# Altium PCB 0060631C.PcbDoc (part 4 of 7)
Units mil, origin at the board's own origin, x right, y up, seen from the top; angles counter-clockwise.
Board outline 5480 x 8249 mil, 6 copper layers (Top Layer, Mid-Layer 1, Mid-Layer 2, Internal Plane 1, Internal Plane 2, Bottom Layer); 514 components, 269 nets, 1375 pads, 1334 vias.
Unrouted connection lines stored in the file: 126.
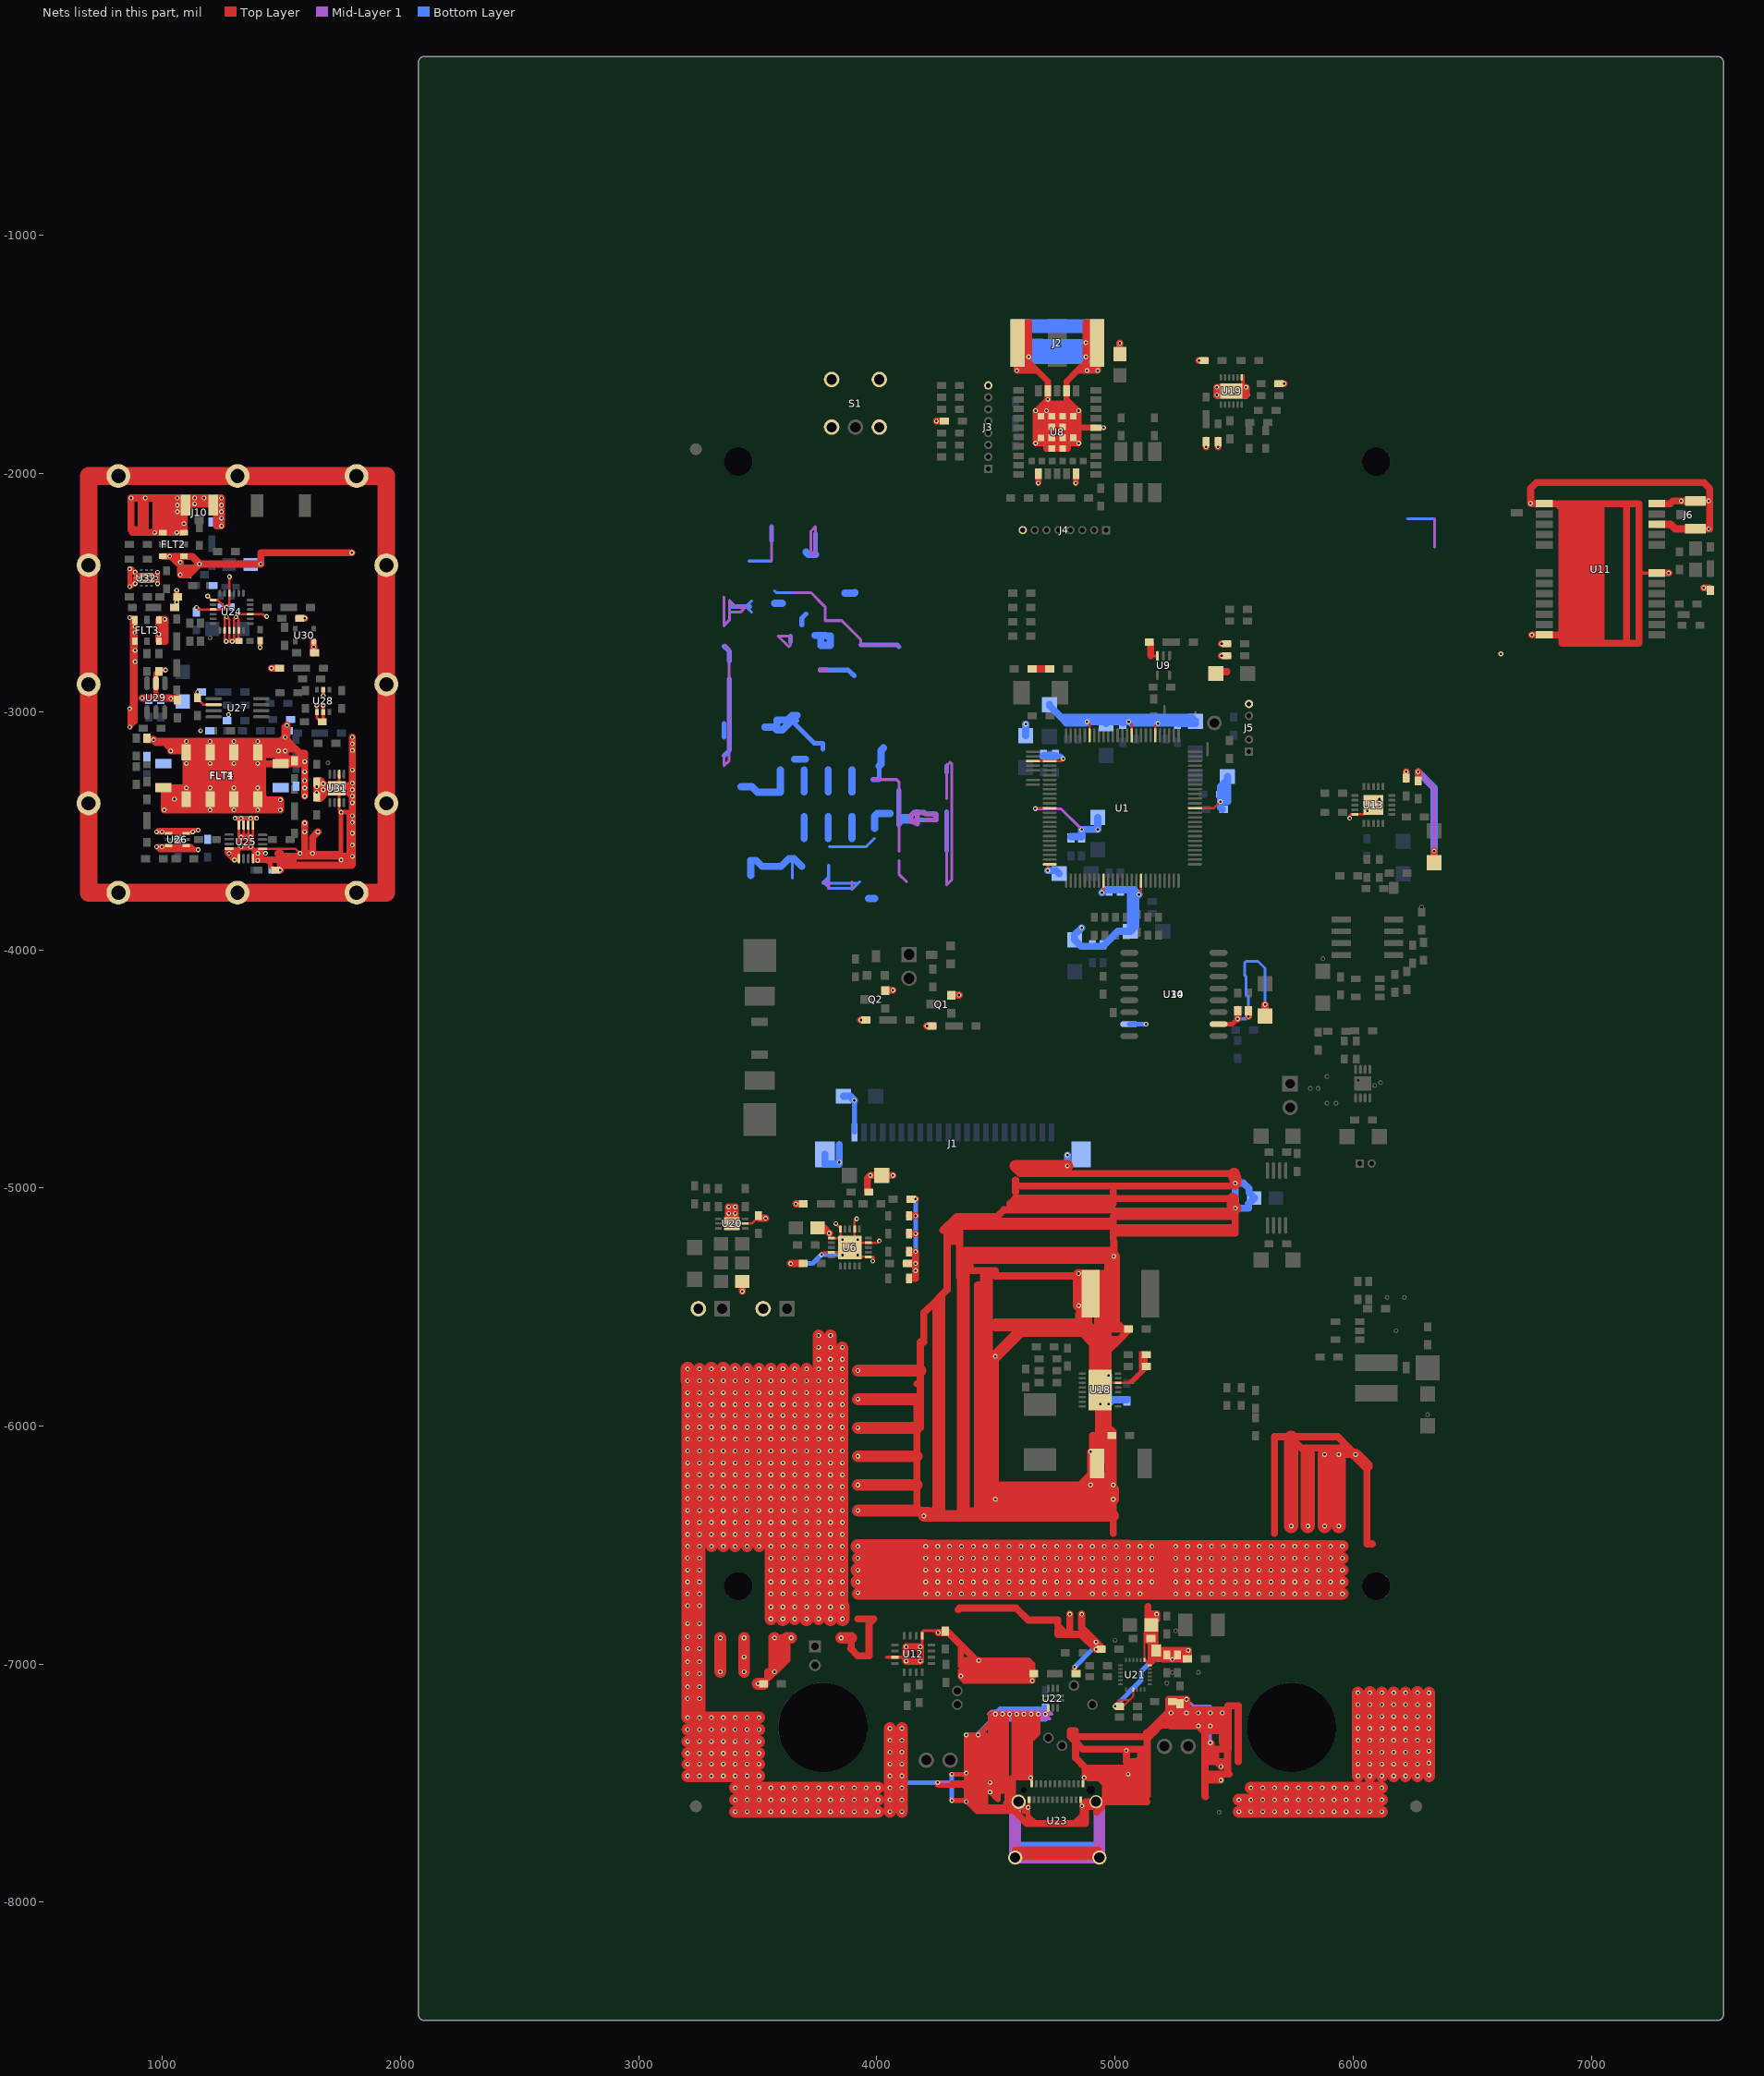
[diagram p8: the nets of this part, all layers, seen from the top]

## Via types
v1: diameter 20, hole 10, Top Layer to Bottom Layer, 1334 vias

## Nets (pads, with @x,y where several pads share a name; then routed paths per layer and width w, separated by ;. In a path a pad name is that pad's centre, name@x,y a point inside that pad or via, vN(x,y) a via of type N, cw(c..) or ccw(c..) an arc to the next point about the centre after c; other vN are vias at no path point) (continued)
GND: (continued)
  Top Layer w30: v1(915,-2942.5) v1(970,-2942.5) 1032.5,-2942.5 v1(1035,-2945) C81.1@1062.5,-2945 ; C79.2@935,-3117.5 v1(962.5,-3117.5) 970,-3125 ; FLT2.6@1001.5,-2347.5 v1(1030,-2347.5) v1@1037.5,-2347.5 ; FLT1.12@1004,-3319 FLT1.12@1005,-3320 ; v1(1050,-3367.5) FLT1.1@1100,-3367.5 ; v1(1330,-3567.5) v1(1370,-3567.5) ~FV41.FV@1370,-3527.5 1360.1,-3527.5 1340.4,-3527.5 v1(1330,-3527.5) ; v1(1457.5,-2817.5) R104.1@1485,-2817.5 ; C120.2@1470,-3665 C120.2@1476,-3665 v1(1495,-3665) 1495,-3645 ; 1484.9,-3595 1495,-3595 ; FLT1.6@1496,-3219 FLT1.6@1496.3,-3218.7 ; 1507.5,-3197.5 1515,-3197.5 ; C78.2@1555,-3212.5 C78.2@1548.8,-3218.7 ; C88.2@1570,-2607.5 C88.2@1576,-2607.5 v1(1597.5,-2607.5) ; 1597.5,-3595 v1(1597.5,-3505) v1(1597.5,-3467.5) ; v1(1597.5,-3355) v1(1597.5,-3320) v1(1597.5,-3290) v1(1597.5,-3252.5) 1597.5,-3225 ; 1615,-3595 1615,-3600 1622.5,-3607.5 ; v1(1630,-3595) 1630,-3527.5 ~FV101.FV@1652.5,-3505 ; R107.2@1632.5,-2752.5 1635,-2750 v1(1635,-2727.5) 1634.5,-2727 U30.2@1634.5,-2705.6 ; U31.9@1732.3,-3322.6 U31.9@1719.7,-3310 ; U31.9@1742.1,-3335 U31.9@1740.1,-3335 ; U31.9@1742.1,-3324.6 U31.9@1740.1,-3322.6 ; U31.9@1742.1,-3320.4 1740.1,-3322.4 U31.9@1740.1,-3322.6 ; U31.9@1742.5,-3335 v1(1752.5,-3335) 1777.5,-3335 v1(1797.5,-3355) ; v1(1795,-2332.5) 1412.5,-2332.5 v1(1412.5,-2380) v1@1157.5,-2380 ; v1(1797.5,-3437.5) v1(1797.5,-3465) v1(1797.5,-3510) v1(1797.5,-3560) 1797.5,-3590 v1(1797.5,-3607.5) ; 1797.5,-3422.5 v1(1797.5,-3382.5) v1(1797.5,-3355) ; v1(1797.5,-3107.5) v1(1797.5,-3135) v1(1797.5,-3162.5) v1(1797.5,-3245) v1(1797.5,-3300) ; v1(3435,-5435) C65.2@3435,-5392.5 ; C64.2@3502.5,-5122.5 3507.5,-5127.5 v1(3532.5,-5127.5) ; R126.2@3524,-7082.5 R126.2@3530,-7082.5 ; v1(3637.5,-5317.5) R24.1@3685,-5317.5 ; v1(3660,-5067.5) R127.1@3685,-5067.5 ; D1.2@3750,-5167.5 3777.5,-5167.5 v1(3800,-5190) ; U6.21@3886.4,-5250.4 3887.1,-5250.4 U6.21@3906.4,-5231.1 ; 3892.5,-6890 3892.5,-6932.5 3890,-6935 3920,-6965 3967.5,-6965 3967.5,-6830 3987.5,-6810 3920,-6810 ; U6.21@3906.1,-5230.7 U6.21@3906.4,-5231.1 ; v1(3920,-5282.5) v1(3855,-5282.5) 3855,-5270.1 3855,-5219 ~FV46.FV@3855,-5217.5 3906.1,-5217.5 ~FV45.FV@3920,-5217.5 3906.8,-5230.7 U6.21@3906.4,-5231.1 ; v1(3932.5,-4295) R4.2@3954,-4295 R4.2@3960,-4295 ; C30.2@3960,-5017.5 3960,-4960 v1(3972.5,-4947.5) C32.2@4020,-4947.5 v1(4067.5,-4947.5) ; Q2.2@4047.5,-4170 v1(4067.5,-4170) ; ~FV120.FV@4122.5,-6987.5 ~FV120.FV@4122.5,-6985 ; C28.2@4122.5,-5317.5 C28.2@4128.5,-5317.5 v1(4162.5,-5317.5) ; U4.2@4135,-5380 4162.5,-5380 v1(4162.5,-5347.5) v1(4162.5,-5317.5) ; U2.2@4135,-5267.5 v1(4162.5,-5267.5) v1(4162.5,-5317.5) ; U5.2@4135,-5192.5 v1(4162.5,-5192.5) ; U3.2@4135,-5117.5 v1(4162.5,-5117.5) ; C29.2@4137.5,-5047.5 C29.2@4143.5,-5047.5 v1(4162.5,-5047.5) ; 4167.5,-5822.5 4182.5,-5822.5 ; v1(4210,-4320) R7.2@4231.5,-4320 R7.2@4237.5,-4320 ; v1(4250,-1780) R27.2@4277.5,-1780 ; v1(4257.5,-6867.5) 4300,-6867.5 4352.5,-6920 ~FV93.FV@4417.5,-6985 ; 4272.5,-6357.5 4272.5,-5460 4267.5,-5455 ; 4277.5,-5177.5 4295,-5160 ; Q1.2@4325,-4190 v1(4345,-4190) ; 4341.2,-6771.2 4347.4,-6765 4585,-6765 4635,-6815 4760,-6815 4760,-6840.2 4795,-6875.2 ; 4372.5,-6985 ~FV93.FV@4417.5,-6985 ; 4390,-7582.5 4407.5,-7600 ; ~FV93.FV@4427.5,-6985 ~FV93.FV@4417.5,-6985 ; ~FV104.FV@4497.4,-5707.5 4497.4,-6247.5 ; 4545,-7585 4562,-7602 ; 4562.5,-7602 4562,-7602 ; 4582.5,-5017.5 4582.5,-4992.5 ; 4582.5,-4967.5 4582.5,-4992.5 ; 4582.5,-4907.5 4582.5,-4922.43 4600.07,-4940 5500,-4940 ; J2.2@4590,-1522.5 J2.2@4602.5,-1510 ; J2.2@4590,-1464.6 J2.2@4590,-1452.5 4590,-1367.5 J2.2@4605,-1367.5 ; 4594.9,-5610 4859.9,-5610 ; J2.2@4602.5,-1507.5 J2.2@4605,-1507.5 ; J2.2@4605,-1467.5 J2.2@4605,-1367.5 ; C11.2@4657.5,-2820 C12.2@4720,-2820 ; 4760,-6857.5 4760,-6875 4760.2,-6875.2 4795,-6875.2 ; v1(4810,-6790.2) 4810,-6875.2 ; v1(4847.4,-5495) C62.2@4867.4,-5495 ; v1(4860,-6790.2) 4860,-6847.7 ~FV49.FV@4920,-6907.7 ; C62.2@4904.9,-5530 C62.2@4889.9,-5530 ; C62.2@4904.9,-5522.5 4897.4,-5515 4904.9,-5515 4904.9,-5445 C62.2@4897.4,-5445 ; 4922.8,-7623 4943.3,-7602.5 4943.3,-7597 4876.3,-7597 ; J2.3@4925,-1452.5 4925,-1367.5 4892.5,-1367.5 ; U23.S3@4934.3,-7812.5 U23.S3@4929.3,-7807.5 ; U18.17@4937.4,-5847.5 U18.17@4937.4,-5848.6 ; U18.17@4947.4,-5838.6 4947.4,-5848.6 U18.17@4937.4,-5848.6 ; 4960,-7495 4960,-7485 5135,-7485 ; 4969.9,-5617.5 4969.9,-5637.5 ; 4992.3,-6377.5 4992.4,-6377.4 ; 4992.4,-6450 4992.4,-6377.4 ; 4992.4,-6287.5 4497.4,-6287.5 ~FV102.FV@4497.4,-6307.5 ; 4992.5,-6377.5 4992.4,-6377.4 ; C25.2@5020,-1497.5 v1(5020,-1452.5) ; 5047.5,-7477 4960,-7477 ; 5047.5,-7447 4960,-7447 ; v1(5047.5,-7362.5) 5047.5,-7410 5092.6,-7410 ; 5133.7,-7578.2 U23.S2@4943.8,-7578.2 ; C66.2@5137.5,-6900.2 C66.2@5140,-6900.2 ; 5137.5,-6757.5 C67.2@5137.5,-6850.2 ; 5150,-2765 R20.2@5150,-2707.5 ; 5162.5,-6980.2 5152.5,-6980.2 5152.5,-6900.2 C66.2@5140,-6900.2 ; C71.2@5272.5,-7160.2 C71.2@5260,-7147.7 ; C73.2@5307.5,-6967.7 5307.5,-6965.2 C73.2@5295,-6965.2 ; v1(5352.5,-1525) C63.2@5374,-1525 C63.2@5380,-1525 ; 5380,-7557.5 5377.5,-7555 5377.5,-7487.5 ; v1(5382.5,-1887.5) R78.2@5382.5,-1866 R78.2@5382.5,-1860 ; v1(5400,-7330.2) 5402.4,-7332.6 5402.4,-7385.1 ; C37.2@5422.5,-2840 5430,-2832.5 5470,-2832.5 ; v1(5432.5,-1887.5) R79.2@5432.5,-1866 R79.2@5432.5,-1860 ; v1(5445,-7487.5) 5377.5,-7487.5 ; v1(5445,-7430) v1@5445,-7427.7 ; v1(5447.5,-2765) C36.2@5469,-2765 C36.2@5475,-2765 ; v1(5447.5,-2715) C38.2@5469,-2715 C38.2@5475,-2715 ; 5493.67,-5045 4992.5,-5045 4992.5,-5066.5 4991.5,-5067.5 4557.5,-5067.5 4582.5,-5042.5 4992.5,-5042.5 4992.5,-4992.5 ; v1(5505,-5085) 5505,-5097.5 ; v1(5505,-4980) 5505,-4992.5 4992.5,-4992.5 ; v1(5515,-4290) C33.2@5515,-4256 C33.2@5515,-4250 ; 5517.5,-7410 5517.5,-7175.2 5475,-7175.2 5475,-7192.5 ; v1(5560,-4280) C34.2@5560,-4256 C34.2@5560,-4250 ; C35.2@5630,-4277.5 v1(5630,-4230) ; 5670,-6450 5670,-6045 5740,-6045 ; R76.2@5682.5,-1622.5 R76.2@5688.5,-1622.5 v1(5710,-1622.5) ; 5810,-6120 5787.5,-6097.5 ; ~FV119.FV@5880,-6120 ~FV118.FV@5940,-6120 ~FV117.FV@6010,-6120 5982.5,-6092.5 ; 6057.5,-6167.5 6057.5,-6495 6080,-6495 ; v1(6060,-3417.5) 6084.4,-3393.1 6084.4,-3392.4 U13.21@6084.4,-3391.9 ; U13.21@6084.6,-3391.6 U13.21@6084.9,-3391.9 ; C41.2@6222.5,-3285 C41.2@6222.5,-3279 v1(6222.5,-3252.5) ; C47.2@6272.5,-3285 v1(6272.5,-3252.5) ; C57.2@6340,-3635 v1(6340,-3585) ; v1(6750,-2677.5) U11.24@6802.8,-2677.5 6877.5,-2677.5 ; 7200.2,-2417.7 7200,-2417.5 ; U11.7@7275,-2417.7 7324.8,-2417.7 v1(7325,-2417.5) ; U11.10@7275,-2213.1 7333.1,-2213.1 7352.5,-2232.5 J6.3@7439,-2232.5 ; U11.12@7275,-2126.5 7331,-2126.5 7342.5,-2115 v1(7377.5,-2115) J6.2@7437.5,-2115 v1(7492.5,-2115) v1@7497.5,-2115 ; J6.3@7437.5,-2231 J6.3@7439,-2232.5 ; v1(7472.5,-2480) 7495,-2480 C39.2@7500,-2485 ; 887.5,-2235 875,-2247.5 v1(967.5,-2247.5) 977.5,-2247.5 ; 887.5,-2235 907.5,-2235 ; 887.5,-2235 867.5,-2235 v1(867.5,-2102.5) 910,-2102.5 ; 907.5,-2235 927.5,-2235 ~FV82.FV@927.5,-2102.5 ; 907.5,-2235 910,-2232.5 910,-2102.5 ; 910,-2102.5 ~FV82.FV@927.5,-2102.5 ; ~FV82.FV@927.5,-2102.5 972.5,-2102.5 ; 970,-3125 v1(1100,-3125) ; 970,-3125 975,-3130 1010,-3130 1035,-3155 ; v1@972.5,-2242.5 995,-2220 995,-2102.5 ; v1@972.5,-2242.5 977.5,-2247.5 ; v1@972.5,-2242.5 972.5,-2102.5 ; 972.5,-2102.5 995,-2102.5 ; 977.5,-2247.5 FLT2.4@1001.5,-2247.5 1020,-2247.5 ; 995,-2102.5 1020,-2102.5 ; FLT1.12@1005,-3320 ~FV38.FV@1100,-3320 ; FLT1.12@1005,-3320 1007.5,-3322.5 v1(1007.5,-3412.5) ; v1(1007.5,-3412.5) 1100,-3412.5 ; v1(1007.5,-3412.5) ~FV37.FV@1010,-3410 ; ~FV37.FV@1010,-3410 1010,-3347.5 1030,-3347.5 ; ~FV37.FV@1010,-3410 1032.5,-3387.5 ; 1020,-2247.5 1020,-2237.5 ; 1020,-2247.5 1030,-2247.5 ; 1020,-2237.5 1030,-2247.5 ; 1020,-2237.5 1020,-2102.5 ; 1020,-2102.5 1042.5,-2102.5 ; 1030,-3347.5 FLT1.1@1100,-3347.5 ; 1030,-3347.5 1030,-3385 1032.5,-3387.5 ; 1030,-2247.5 v1(1060,-2247.5) FLT2.3@1090,-2247.5 1090,-2227.5 ; 1032.5,-3387.5 FLT1.1@1100,-3387.5 ; 1035,-3155 FLT1.10@1100,-3155 ; 1035,-3155 ~FV36.FV@1035,-3165 1094.5,-3165 FLT1.10@1100,-3170.5 ; v1@1037.5,-2347.5 FLT2.1@1090,-2347.5 1125,-2347.5 v1@1157.5,-2380 ; v1@1037.5,-2347.5 1062.5,-2372.5 ; 1042.5,-2210 1042.5,-2102.5 ; 1042.5,-2210 1042.5,-2227.5 1090,-2227.5 ; 1042.5,-2210 1062.5,-2210 ; 1042.5,-2102.5 v1(1062.5,-2102.5) ; 1062.5,-2372.5 1075,-2385 ; 1062.5,-2372.5 v1(1075,-2372.5) 1075,-2385 ; 1062.5,-2210 ~FV31.FV@1090,-2210 ; 1062.5,-2210 v1(1062.5,-2160) v1(1062.5,-2132.5) v1(1062.5,-2102.5) ; v1(1062.5,-2102.5) ~FV30.FV@1127.5,-2102.5 ; 1075,-2397.5 1137.5,-2397.5 ; 1075,-2397.5 v1(1075,-2425) 1110,-2425 1137.5,-2397.5 ; 1075,-2397.5 1075,-2385 ; 1090,-2227.5 ~FV31.FV@1090,-2210 ; ~FV31.FV@1090,-2210 J10.2@1090,-2160 ; J10.2@1090,-2160 1122.5,-2127.5 ~FV72.FV@1135,-2127.5 ; J10.2@1090,-2160 1090,-2140 J10.2@1097.5,-2132.5 ~FV30.FV@1127.5,-2102.5 ; 1100,-3412.5 v1(1200,-3412.5) ; 1100,-3412.5 FLT1.1@1100,-3387.5 ; FLT1.1@1100,-3387.5 FLT1.2@1200,-3387.5 ; FLT1.1@1100,-3387.5 FLT1.1@1100,-3367.5 ; FLT1.1@1100,-3367.5 FLT1.1@1100,-3347.5 ; FLT1.1@1100,-3367.5 1107.5,-3360 FLT1.2@1200,-3360 ; FLT1.1@1100,-3347.5 1100,-3332.5 ; 1100,-3332.5 1200,-3332.5 ; 1100,-3332.5 ~FV38.FV@1100,-3320 ; ~FV38.FV@1100,-3320 1100,-3305 ; 1100,-3305 1200,-3305 ; 1100,-3305 1100,-3277.5 ; 1100,-3277.5 1100,-3247.5 ; 1100,-3277.5 1200,-3277.5 ; 1100,-3247.5 v1(1100,-3217.5) v1@1100,-3215 ; 1100,-3247.5 1200,-3247.5 ; v1@1100,-3215 1103.7,-3218.7 v1@1200,-3218.7 ; v1@1100,-3215 FLT1.10@1100,-3170.5 ; v1@1100,-3215 1117.5,-3197.5 FLT1.9@1200,-3197.5 ; FLT1.10@1100,-3170.5 FLT1.10@1100,-3155 ; FLT1.10@1100,-3170.5 1109.5,-3180 FLT1.9@1200,-3180 ; FLT1.10@1100,-3155 FLT1.9@1200,-3155 ; FLT1.10@1100,-3155 FLT1.10@1100,-3147.5 ; FLT1.10@1100,-3147.5 FLT1.9@1200,-3147.5 ; FLT1.10@1100,-3147.5 v1(1100,-3125) ; v1(1100,-3125) v1(1200,-3125) ; ~FV30.FV@1127.5,-2102.5 ~FV30.FV@1135,-2102.5 ; ~FV72.FV@1135,-2127.5 1175,-2127.5 ; ~FV72.FV@1135,-2127.5 ~FV30.FV@1135,-2102.5 ; ~FV30.FV@1135,-2102.5 ~FV71.FV@1175,-2102.5 ; 1137.5,-2397.5 v1(1155,-2380) v1@1157.5,-2380 ; 1175,-2127.5 J10.3@1218.5,-2127.5 ; 1175,-2127.5 ~FV71.FV@1175,-2102.5 ; ~FV71.FV@1175,-2102.5 v1@1243.5,-2102.5 ; v1(1200,-3412.5) v1(1300,-3412.5) ; v1(1200,-3412.5) FLT1.2@1200,-3387.5 ; FLT1.2@1200,-3387.5 FLT1.3@1300,-3387.5 ; FLT1.2@1200,-3387.5 FLT1.2@1200,-3367.5 FLT1.2@1200,-3360 ; FLT1.2@1200,-3360 FLT1.3@1300,-3360 ; FLT1.2@1200,-3360 1200,-3332.5 ; 1200,-3332.5 1300,-3332.5 ; 1200,-3332.5 v1(1200,-3320) 1200,-3305 ; 1200,-3305 1300,-3305 ; 1200,-3305 1200,-3277.5 ; 1200,-3277.5 1300,-3277.5 ; 1200,-3277.5 1200,-3247.5 ; 1200,-3247.5 v1@1200,-3218.7 ; 1200,-3247.5 1300,-3247.5 ; v1@1200,-3218.7 v1@1300,-3218.7 ; v1@1200,-3218.7 v1(1200,-3217.5) FLT1.9@1200,-3197.5 ; FLT1.9@1200,-3197.5 FLT1.8@1300,-3197.5 ; FLT1.9@1200,-3197.5 FLT1.9@1200,-3180 ; FLT1.9@1200,-3180 FLT1.8@1300,-3180 ; FLT1.9@1200,-3180 FLT1.9@1200,-3170.5 FLT1.9@1200,-3155 ; FLT1.9@1200,-3155 FLT1.8@1300,-3155 ; FLT1.9@1200,-3155 FLT1.9@1200,-3147.5 ; FLT1.9@1200,-3147.5 FLT1.8@1300,-3147.5 ; FLT1.9@1200,-3147.5 v1(1200,-3125) ; v1(1200,-3125) v1(1300,-3125) ; J10.3@1218.5,-2127.5 v1@1243.5,-2102.5 ; J10.3@1218.5,-2127.5 J10.3@1213.5,-2132.5 1227.5,-2146.5 1227.5,-2220 v1(1247.5,-2220) v1(1247.5,-2187.5) v1(1247.5,-2160) v1(1247.5,-2132.5) v1(1247.5,-2102.5) v1@1243.5,-2102.5 ; v1(1300,-3412.5) v1(1400,-3412.5) ; v1(1300,-3412.5) FLT1.3@1300,-3387.5 ; FLT1.3@1300,-3387.5 1397.5,-3387.5 FLT1.4@1400,-3390 ; FLT1.3@1300,-3387.5 FLT1.3@1300,-3367.5 FLT1.3@1300,-3360 ; FLT1.3@1300,-3360 FLT1.4@1400,-3360 ; FLT1.3@1300,-3360 1300,-3332.5 ; 1300,-3332.5 1387.5,-3332.5 ; 1300,-3332.5 v1(1300,-3320) 1300,-3305 ; 1300,-3305 1395,-3305 ; 1300,-3305 1300,-3277.5 ; 1300,-3277.5 1300,-3247.5 ; 1300,-3277.5 1400,-3277.5 ; 1300,-3247.5 v1@1300,-3218.7 ; 1300,-3247.5 1400,-3247.5 v1@1400,-3218.7 ; v1@1300,-3218.7 v1@1400,-3218.7 ; v1@1300,-3218.7 v1(1300,-3217.5) FLT1.8@1300,-3197.5 ; FLT1.8@1300,-3197.5 FLT1.7@1400,-3197.5 ; FLT1.8@1300,-3197.5 FLT1.8@1300,-3180 ; FLT1.8@1300,-3180 FLT1.7@1400,-3180 ; FLT1.8@1300,-3180 FLT1.8@1300,-3170.5 FLT1.8@1300,-3155 ; FLT1.8@1300,-3155 FLT1.7@1400,-3155 ; FLT1.8@1300,-3155 FLT1.8@1300,-3147.5 ; FLT1.8@1300,-3147.5 FLT1.7@1400,-3147.5 ; FLT1.8@1300,-3147.5 v1(1300,-3125) ; v1(1300,-3125) v1(1400,-3125) ; 1387.5,-3332.5 1400,-3332.5 ; 1387.5,-3332.5 v1(1400,-3320) ; 1395,-3305 1400,-3305 ; 1395,-3305 1400,-3300 ; v1(1400,-3412.5) v1(1495,-3412.5) 1495,-3390 ; v1(1400,-3412.5) FLT1.4@1400,-3390 ; FLT1.4@1400,-3390 FLT1.4@1400,-3387.5 ; FLT1.4@1400,-3387.5 1402.5,-3390 1495,-3390 ; FLT1.4@1400,-3387.5 FLT1.4@1400,-3367.5 ; FLT1.4@1400,-3367.5 1402.5,-3370 1435,-3370 ; FLT1.4@1400,-3367.5 FLT1.4@1400,-3360 ; FLT1.4@1400,-3360 1400,-3332.5 ; 1400,-3332.5 v1(1400,-3320) ; v1(1400,-3320) 1400,-3305 ; 1400,-3305 1400,-3300 ; 1400,-3300 1400,-3277.5 ; 1400,-3277.5 1420,-3277.5 ; v1@1400,-3218.7 1420,-3218.7 ; v1@1400,-3218.7 v1(1400,-3217.5) FLT1.7@1400,-3197.5 ; FLT1.7@1400,-3197.5 1420,-3197.5 ; FLT1.7@1400,-3197.5 FLT1.7@1400,-3180 ; FLT1.7@1400,-3180 1420,-3180 ; FLT1.7@1400,-3180 FLT1.7@1400,-3170.5 FLT1.7@1400,-3155 ; FLT1.7@1400,-3155 1420,-3155 ; FLT1.7@1400,-3155 FLT1.7@1400,-3147.5 ; FLT1.7@1400,-3147.5 v1(1400,-3125) ; v1(1400,-3125) 1420,-3125 ; 1420,-3277.5 1420,-3355 1435,-3370 ; 1420,-3277.5 1420,-3218.7 ; 1420,-3218.7 1420,-3197.5 ; 1420,-3218.7 FLT1.6@1496.3,-3218.7 ; 1420,-3197.5 1420,-3180 ; 1420,-3180 1420,-3155 ; 1420,-3180 1487.5,-3180 ; 1420,-3155 1487.5,-3155 ; 1420,-3155 1420,-3125 ; 1420,-3125 1485,-3125 ; 1435,-3370 v1(1495,-3370) 1495,-3390 ; 1485,-3125 1487.5,-3127.5 1487.5,-3147.5 ; 1485,-3125 1497.5,-3125 v1(1515,-3107.5) ; 1487.5,-3180 1495,-3180 ; 1487.5,-3180 1487.5,-3209.9 FLT1.6@1496.3,-3218.7 ; 1487.5,-3155 1505,-3155 v1(1515,-3165) ; 1487.5,-3155 v1(1487.5,-3165) v1@1495,-3165 ; 1487.5,-3155 1487.5,-3147.5 ; 1487.5,-3147.5 1515,-3147.5 ; 1495,-3645 1795,-3645 1797.5,-3642.5 1797.5,-3620 v1(1797.5,-3607.5) ; 1495,-3645 1495,-3622.5 1495,-3612.5 ; 1495,-3612.5 1507.5,-3607.5 ; 1495,-3612.5 1495,-3595 ; 1495,-3595 1507.5,-3607.5 ; 1495,-3180 v1@1495,-3165 ; 1495,-3180 1505,-3180 1515,-3190 ; v1@1495,-3165 v1(1515,-3165) ; FLT1.6@1496.3,-3218.7 1515,-3200 1515,-3197.5 ; FLT1.6@1496.3,-3218.7 C78.2@1548.8,-3218.7 ; 1507.5,-3607.5 1552.5,-3607.5 1622.5,-3607.5 ; 1515,-3197.5 1597.5,-3197.5 ; 1515,-3197.5 1515,-3190 ; 1515,-3190 v1(1515,-3165) ; v1(1515,-3165) v1@1515,-3160 ; v1@1515,-3160 1515,-3147.5 ; v1@1515,-3160 1518.7,-3156.3 1558.8,-3156.3 ; 1515,-3147.5 v1@1515,-3112.5 ; v1@1515,-3112.5 v1(1515,-3107.5) ; v1@1515,-3112.5 1558.8,-3156.3 ; v1(1515,-3107.5) 1515,-3065 v1(1522.5,-3057.5) 1522.5,-3100 v1(1515,-3107.5) ; C78.2@1548.8,-3218.7 1591.2,-3218.7 1597.5,-3225 ; 1558.8,-3156.3 1577.5,-3175 1597.5,-3175 1597.5,-3197.5 ; 1597.5,-3225 v1(1597.5,-3210) 1597.5,-3197.5 ; 1622.5,-3607.5 1750,-3607.5 v1(1797.5,-3607.5) ; v1(1647.5,-3340) 1660,-3352.5 1662.5,-3352.5 1662.5,-3365 ; v1(1647.5,-3340) C105.2@1647.5,-3359 1647.5,-3365 1662.5,-3365 ; v1(1647.5,-3340) v1(1647.5,-3315) C104.2@1647.5,-3296 1647.5,-3290 1662.5,-3290 v1(1675,-3302.5) ; 1662.5,-3365 1675,-3352.5 1675,-3350 ; 1675,-3350 1690,-3335 v1(1712.5,-3335) ; 1675,-3350 v1(1675,-3327.5) v1(1675,-3302.5) ; v1(1675,-3302.5) 1682.5,-3310 v1(1712.5,-3310) U31.9@1719.7,-3310 ; v1(1712.5,-3335) U31.9@1740.1,-3335 ; v1(1712.5,-3335) 1719.7,-3327.8 U31.9@1719.7,-3310 ; U31.9@1719.7,-3310 1742.1,-3310 v1(1752.5,-3310) 1787.5,-3310 v1(1797.5,-3300) ; U31.9@1740.1,-3335 U31.9@1740.1,-3322.6 ; v1(1797.5,-3355) ~FV97.FV@1797.5,-3327.5 v1(1797.5,-3300) ; v1(3377.5,-5107.5) 3377.5,-5136.5 U20.7@3391.3,-5150.3 3405,-5136.6 v1(3405,-5107.5) ; v1(3377.5,-5107.5) v1(3377.5,-5080) v1(3405,-5080) v1(3405,-5107.5) ; v1(3377.5,-5107.5) v1(3405,-5107.5) ; ~FV111.FV@3567.5,-7032.5 3542.5,-7057.5 3542.5,-7032.5 ~FV111.FV@3567.5,-7032.5 ; ~FV111.FV@3567.5,-7032.5 ~FV111.FV@3570,-7032.5 ; ~FV111.FV@3570,-7032.5 3601.2,-7001.3 ; ~FV111.FV@3570,-7032.5 3570,-7015 3587.5,-6997.5 3597.5,-6997.5 ; 3597.5,-6997.5 3597.5,-6890 3622.5,-6890 3622.5,-6980 3601.2,-7001.3 ; 3597.5,-6997.5 3601.2,-7001.3 ; ~FV120.FV@4122.5,-6985 4125,-6987.5 ~FV56.FV@4182.5,-6987.5 ~FV48.FV@4182.5,-6927.5 ~FV55.FV@4122.5,-6927.5 ~FV120.FV@4122.5,-6985 ; 4167.5,-6007.5 4182.5,-6007.5 4182.5,-5887.5 ; 4167.5,-6007.5 4167.5,-5887.5 4182.5,-5887.5 ; 4167.5,-6007.5 4167.5,-6127.5 4167.5,-6247.5 4167.5,-6355 4218.7,-6355 4221.2,-6357.5 4247.5,-6357.5 4247.5,-5475 ; 4182.5,-5887.5 4182.5,-5822.5 ; 4182.5,-5822.5 4182.5,-5767.5 4182.5,-5647.5 4197.5,-5647.5 4197.5,-5525 4247.5,-5475 ; 4247.5,-5475 4267.5,-5455 ; 4267.5,-5455 4295,-5427.5 4295,-5225 ; 4295,-5225 4295,-5160 ; 4295,-5225 4322.5,-5225 ; 4295,-5160 4315,-5140 ; 4295,-5160 4322.5,-5160 4322.5,-5225 ; 4315,-5140 4992.5,-5140 ; 4315,-5140 4335,-5120 4505,-5120 4532.5,-5092.5 4992.5,-5092.5 4992.5,-5097.5 5493.67,-5097.5 5505,-5097.5 ; 4322.5,-5225 4347.5,-5225 ; 4347.5,-5330 4392.5,-5330 4375,-5347.5 ; 4347.5,-5330 4347.5,-5305 ; 4347.5,-5330 4347.5,-5375 4350,-5372.5 ; 4347.5,-5305 4417.5,-5305 ; 4347.5,-5305 4347.5,-5287.5 ; 4347.5,-5287.5 4347.5,-5262.5 ; 4347.5,-5287.5 4435,-5287.5 4417.5,-5305 ; 4347.5,-5262.5 4995,-5262.5 ; 4347.5,-5262.5 4347.5,-5225 ; 4347.5,-5225 4347.5,-5160 4992.5,-5160 4992.5,-5140 ; 4350,-5372.5 4375,-5347.5 ; 4350,-5372.5 4350,-6357.5 4375,-6357.5 ; 4375,-6357.5 4422.5,-6357.5 ; 4375,-6357.5 4375,-5347.5 ; 4375,-5347.5 4447.4,-5347.5 ; 4417.5,-5305 4969.9,-5305 ; 4422.5,-6357.5 4422.5,-5407.5 4447.4,-5407.5 ; 4422.5,-6357.5 4447.4,-6357.5 ; 4447.4,-6357.5 4447.4,-6332.5 ; 4447.4,-6357.5 4992.4,-6357.5 ; 4447.4,-6332.5 4992.4,-6332.5 ; 4447.4,-6332.5 4447.4,-6307.5 ; 4447.4,-6307.5 4472.4,-6307.5 ; 4447.4,-6307.5 4447.4,-5407.5 ; 4447.4,-5407.5 4447.4,-5347.5 ; 4447.4,-5347.5 4472.4,-5347.5 ; 4472.4,-6307.5 4472.4,-5347.5 ; 4472.4,-6307.5 ~FV102.FV@4497.4,-6307.5 ; 4472.4,-5347.5 4497.4,-5347.5 4497.4,-5370 4842.4,-5370 4847.4,-5365 v1(4847.4,-5360) C62.2@4897.4,-5360 ; ~FV102.FV@4497.4,-6307.5 v1(4992.4,-6307.5) 4992.4,-6332.5 ; 4497.4,-6247.5 4497.4,-6267.5 4992.4,-6267.5 ~FV47.FV@4992.4,-6247.5 ; 4497.4,-6247.5 4852.5,-6247.5 ; 4562,-7602 4579.5,-7619.5 4629.5,-7669.5 4665,-7669.5 4876.3,-7669.5 4876.3,-7639.5 4876.3,-7597 ; 4582.5,-4992.5 4992.5,-4992.5 ; J2.2@4605,-1367.5 4622.5,-1367.5 ; 4622.5,-1367.5 4622.5,-1510 v1(4637.5,-1510) 4637.5,-1367.5 4622.5,-1367.5 ; 4795,-6875.2 4810,-6875.2 ; 4810,-6875.2 4857.5,-6875.2 v1(4920,-6937.7) ; 4832.5,-7325 4832.5,-7305.2 ; 4832.5,-7325 4834.7,-7327.2 ; 4832.5,-7325 4812.6,-7305.1 4812.6,-7280.1 4832.4,-7280.1 4832.5,-7280.2 4832.5,-7305.2 ; 4832.5,-7305.2 5135,-7305.2 5135,-7290 5132.5,-7287.5 5137.5,-7287.5 ; 4834.7,-7327.2 4834.7,-7394.2 4875,-7434.5 ; 4834.7,-7327.2 4865.1,-7357.6 5130,-7357.6 ; 4837.4,-5587.5 4847.4,-5587.5 ; 4837.4,-5587.5 4497.4,-5587.5 4497.4,-5562.5 4847.4,-5562.5 ; 4837.4,-5587.5 4859.9,-5610 ; 4847.4,-5587.5 4847.4,-5562.5 ; 4847.4,-5587.5 4864.9,-5587.5 ; 4847.4,-5562.5 4847.4,-5530 C62.2@4867.4,-5530 ; 4852.5,-6247.5 C59.2@4897.4,-6202.6 ; 4852.5,-6247.5 ~FV58.FV@4897.4,-6247.5 ; 4859.9,-5610 4904.9,-5655 ; 4864.9,-5587.5 4904.9,-5627.5 ; 4864.9,-5587.5 4867.4,-5587.5 ; 4867.4,-5587.5 4904.9,-5587.5 ; 4867.4,-5587.5 C62.2@4867.4,-5530 ; C62.2@4867.4,-5530 C62.2@4867.4,-5495 ; C62.2@4867.4,-5495 C62.2@4889.9,-5495 ; 4875,-7464.5 4875,-7434.5 ; 4875,-7464.5 4887.5,-7464.5 4887.5,-7447 4960,-7447 ; 4875,-7464.5 4887.5,-7477 4935,-7477 ; 4875,-7434.5 4878,-7437.5 5135,-7437.5 ; 4876.3,-7597 4876.3,-7578.2 U23.S2@4920.1,-7578.2 U23.S2@4943.8,-7578.2 ; C62.2@4889.9,-5530 C62.2@4889.9,-5495 ; C62.2@4889.9,-5530 4889.9,-5572.5 4904.9,-5587.5 ; C62.2@4889.9,-5495 4889.9,-5452.5 C62.2@4897.4,-5445 ; 4892.5,-1367.5 4892.5,-1510 ~FV79.FV@4877.5,-1510 v1(4877.5,-1450) 4877.5,-1367.5 4892.5,-1367.5 ; ~FV58.FV@4897.4,-6247.5 ~FV47.FV@4992.4,-6247.5 ; ~FV58.FV@4897.4,-6247.5 4897.4,-6227.5 4992.4,-6227.5 ; C59.2@4897.4,-6202.6 ~FV103.FV@4897.4,-6107.5 4904.9,-6100 4904.9,-6040 4929.9,-6040 ; C59.2@4897.4,-6202.6 4897.4,-6207.5 4972.4,-6207.5 4972.4,-6047.5 4964.9,-6040 ; C62.2@4897.4,-5445 C62.2@4897.4,-5360 ; C62.2@4897.4,-5360 C62.2@4927.4,-5360 ; 4904.9,-5655 4904.9,-5627.5 ; 4904.9,-5655 4904.9,-5760 4927.4,-5760 ; 4904.9,-5627.5 4904.9,-5622.5 ; 4904.9,-5622.5 4904.9,-5587.5 ; 4904.9,-5622.5 4917.5,-5622.5 ; 4917.5,-5622.5 4917.5,-5640 4927.4,-5640 ; 4917.5,-5622.5 4927.4,-5622.5 ; v1(4920,-6937.7) ~FV49.FV@4920,-6907.7 ; v1(4920,-6937.7) C72.2@4941.5,-6937.7 4947.5,-6937.7 4947.5,-6935.2 4945.75,-6933.45 ~FV49.FV@4920,-6907.7 ; 4927.4,-5760 4947.4,-5760 ; 4927.4,-5760 4927.4,-5640 ; 4927.4,-5640 4947.4,-5640 ; 4927.4,-5640 4927.4,-5622.5 ; 4927.4,-5622.5 C62.2@4927.4,-5360 ; C62.2@4927.4,-5360 4947.4,-5360 ; U23.S3@4929.3,-7807.5 4929.3,-7780 4580.7,-7780 U23.S4@4580.7,-7812.5 4585.7,-7807.5 U23.S3@4929.3,-7807.5 ; 4929.9,-6045 4934.9,-6040 ; 4929.9,-6045 4929.9,-6040 ; 4929.9,-6045 4929.9,-6155 4932.4,-6157.5 4954.9,-6135 4954.9,-6040 ; 4929.9,-6040 U18.17@4929.9,-5900 ; 4929.9,-6040 4934.9,-6040 ; U18.17@4929.9,-5900 4929.9,-5856.1 U18.17@4937.4,-5848.6 ; U18.17@4929.9,-5900 v1(4937.4,-5907.5) U18.17@4954.9,-5890 ; 4934.9,-6040 4954.9,-6040 ; 4935,-7477 4960,-7502 4960,-7506.5 ; 4935,-7477 4960,-7477 ; U18.17@4937.4,-5848.6 U18.17@4947.4,-5829 ; U23.S2@4943.8,-7578.2 4960,-7562 ; U18.17@4947.4,-5829 4969.4,-5785.97 4969.9,-5785 4969.9,-5819.1 U18.17@4969.9,-5866.1 ; U18.17@4947.4,-5829 4947.4,-5760 ; 4947.4,-5760 4969.9,-5760 4969.9,-5685 ; 4947.4,-5760 4947.4,-5640 ; 4947.4,-5640 4947.4,-5360 ; 4947.4,-5360 4969.9,-5360 ; 4954.9,-6040 U18.17@4954.9,-5890 ; 4954.9,-6040 4964.9,-6040 ; U18.17@4954.9,-5890 4954.9,-5866.1 U18.17@4969.9,-5866.1 ; 4960,-7562 4970,-7552 5135,-7552 5135,-7512.5 ; 4960,-7562 4960,-7529 ; 4960,-7529 5118.5,-7529 5135,-7512.5 ; 4960,-7529 4960,-7506.5 ; 4960,-7506.5 5129,-7506.5 5135,-7512.5 ; 4960,-7477 4960,-7462.5 ; 4960,-7462.5 4960,-7447 ; 4960,-7462.5 v1(5055,-7462.5) 5135,-7462.5 ; 4964.9,-6040 C131.2@4986.4,-6040 C131.2@4992.4,-6040 ; U18.17@4969.9,-5866.1 4969.9,-6002.5 4992.4,-6025 C131.2@4992.4,-6040 ; 4969.9,-5685 4969.9,-5637.5 ; 4969.9,-5685 5017.4,-5637.5 ; 4969.9,-5637.5 5017.4,-5637.5 ; 4969.9,-5360 4969.9,-5592.5 4997.5,-5592.5 ; 4969.9,-5360 4969.9,-5305 ; 4969.9,-5305 4969.9,-5297.5 4980.1,-5287.5 ~FV59.FV@4995,-5287.5 4995,-5262.5 ; 4992.4,-6377.4 4992.4,-6357.5 ; 4992.4,-6357.5 4992.4,-6332.5 ; ~FV47.FV@4992.4,-6247.5 4992.4,-6227.5 ; 4992.4,-6227.5 C131.2@4992.4,-6040 ; 4992.5,-5190 4992.5,-5167.5 5505,-5167.5 ; 4992.5,-5190 5505,-5190 5505,-5167.5 ; 4992.5,-5190 4992.5,-5212.5 4995,-5225 4995,-5262.5 ; 4992.5,-5140 4992.5,-5120 5505,-5120 ; 4997.5,-5592.5 4995,-5590 4995,-5555 5032.5,-5592.5 ; 4997.5,-5592.5 5032.5,-5592.5 ; 5017.4,-5637.5 5062.4,-5592.5 C130.2@5056.4,-5592.5 5032.5,-5592.5 ; 5092.6,-7410 5115.1,-7387.5 5107.6,-7380 5130,-7357.6 ; 5092.6,-7410 5135,-7410 ; 5130,-7357.6 5135,-7357.6 ; 5135,-7512.5 5135,-7485 ; 5135,-7485 5135,-7462.5 ; 5135,-7462.5 5135,-7437.5 ; 5135,-7437.5 5135,-7410 ; 5135,-7410 5135,-7357.6 ; 5135,-7357.6 5135,-7312.7 5160.2,-7287.5 ; 5137.5,-7287.5 5225,-7200 5225,-7147.7 R87.2@5235,-7147.7 ; 5137.5,-7287.5 5160.2,-7287.5 ; C67.2@5137.5,-6850.2 5137.5,-6897.7 C66.2@5140,-6900.2 ; C67.2@5137.5,-6850.2 C67.2@5152.5,-6835.2 ; C67.2@5152.5,-6835.2 C67.2@5157.5,-6830.2 ; C67.2@5152.5,-6835.2 5162.5,-6845.2 5162.5,-6932.7 TP15.1@5172.5,-6942.7 TP15.1@5177.5,-6942.7 ; C67.2@5157.5,-6830.2 5157.5,-6790.2 v1(5175,-6790.2) 5175,-6812.7 C67.2@5157.5,-6830.2 ; 5160.2,-7287.5 5192.5,-7255.2 5225,-7255.2 5225,-7252.6 ; TP15.1@5177.5,-6942.7 5190,-6942.7 ~FV54.FV@5307.5,-6942.7 5307.5,-6952.7 C73.2@5295,-6965.2 ; TP15.1@5177.5,-6942.7 5190,-6955.2 5200,-6965.2 5220,-6965.2 5260,-6965.2 C73.2@5295,-6965.2 ; 5225,-7252.6 5225,-7205.2 v1(5235,-7205.2) ; 5225,-7252.6 5232.5,-7260.1 ~FV121.FV@5350.1,-7260.1 ; v1(5235,-7205.2) 5235,-7230.2 5350,-7230.2 5442.5,-7230.2 ; v1(5235,-7205.2) ~FV53.FV@5300,-7205.2 ; v1(5235,-7205.2) 5235,-7177.7 ; 5235,-7177.7 5237.5,-7180.2 5255,-7180.2 ; 5235,-7177.7 R87.2@5235,-7147.7 ; R87.2@5235,-7147.7 C71.2@5260,-7147.7 ; 5255,-7180.2 5255,-7152.7 C71.2@5260,-7147.7 ; 5255,-7180.2 5300,-7180.2 ; C71.2@5260,-7147.7 v1(5300,-7147.7) 5300,-7180.2 ; ~FV53.FV@5300,-7205.2 5312.7,-7192.5 ; ~FV53.FV@5300,-7205.2 5300,-7192.5 ; ~FV53.FV@5300,-7205.2 v1(5350,-7205.2) v1(5400,-7205.2) ~FV105.FV@5450,-7205.2 ; 5300,-7192.5 5312.7,-7192.5 ; 5300,-7192.5 5300,-7180.2 ; 5312.7,-7192.5 5450,-7192.5 ; ~FV121.FV@5350.1,-7260.1 5377.5,-7287.5 ; ~FV121.FV@5350.1,-7260.1 ~FV107.FV@5400.1,-7260.1 5422.7,-7260.1 5422.7,-7250 5442.5,-7230.2 ; 5377.5,-7487.5 5377.5,-7462.5 ; 5377.5,-7462.5 5479.8,-7462.5 5472.5,-7455.2 5472.5,-7410 ; 5377.5,-7462.5 5377.5,-7410 ; 5377.5,-7410 5427.3,-7410 ; 5377.5,-7410 5377.5,-7360.2 ; 5377.5,-7360.2 5377.5,-7287.5 ; 5377.5,-7360.2 5402.4,-7385.1 ; 5377.5,-7287.5 5377.5,-7280.2 5450,-7280.2 ; 5402.4,-7385.1 5418.7,-7401.4 ; 5418.7,-7401.4 5422.5,-7397.5 ; 5418.7,-7401.4 5422.5,-7405.2 5422.5,-7397.5 ; 5422.5,-7397.5 5422.5,-7357.6 5475,-7357.6 ; 5427.3,-7410 5445,-7410 ; 5427.3,-7410 v1@5445,-7427.7 ; 5442.5,-7230.2 5450,-7230.2 ; v1@5445,-7427.7 5445,-7410 ; 5445,-7410 5472.5,-7410 ; 5450,-7280.2 5450,-7230.2 ; 5450,-7280.2 5450,-7330.2 5474.8,-7330.2 5475,-7330 ; 5450,-7230.2 ~FV105.FV@5450,-7205.2 ; ~FV105.FV@5450,-7205.2 5450,-7192.5 ; 5450,-7192.5 5475,-7192.5 ; 5472.5,-7410 5472.5,-7360.1 5475,-7357.6 ; 5475,-7357.6 5475,-7330 ; 5475,-7330 5475,-7192.5 ; U19.13@5488.2,-1670 5550,-1670 ~FV76.FV@5550,-1637.5 5540,-1637.5 5532.5,-1637.5 U19.13@5488.2,-1637.5 ; U19.13@5488.2,-1670 v1(5427.5,-1670) v1(5427.5,-1637.5) U19.13@5488.2,-1637.5 ; U19.13@5488.2,-1670 U19.13@5488.2,-1653 U19.13@5488.2,-1637.5 ; 5505,-5167.5 5505,-5120 ; 5505,-5120 5505,-5097.5 ; 5740,-6045 5935,-6045 5982.5,-6092.5 ; 5740,-6045 5740,-6050 5787.5,-6097.5 ; 5787.5,-6097.5 5792.5,-6092.5 5982.5,-6092.5 ; U13.21@6084.4,-3391.9 U13.21@6084.9,-3391.9 ; U13.21@6084.4,-3391.9 6082.4,-3389.9 6082.7,-3389.7 6060.5,-3367.5 v1(6110,-3367.5) 6110,-3417 U13.21@6084.9,-3391.9 ; 6856.5,-2126.5 6877.5,-2147.5 ; 6856.5,-2126.5 6877.5,-2126.5 ; 6856.5,-2126.5 U11.13@6802.8,-2126.5 6746.5,-2126.5 ~FV28.FV@6745,-2125 6745,-2062.5 6770,-2037.5 7472.5,-2037.5 7497.5,-2062.5 v1@7497.5,-2115 ; 6877.5,-2677.5 6877.5,-2712.5 6902.5,-2712.5 ; 6877.5,-2677.5 6877.5,-2147.5 ; 6877.5,-2147.5 6877.5,-2126.5 ; 6877.5,-2126.5 6902.5,-2126.5 ; 6902.5,-2712.5 6902.5,-2126.5 ; 6902.5,-2712.5 6930,-2712.5 ; 6902.5,-2126.5 6930,-2126.5 ; 6930,-2712.5 6930,-2126.5 ; 6930,-2712.5 6957.5,-2712.5 ; 6930,-2126.5 6957.5,-2126.5 ; 6957.5,-2712.5 6985,-2712.5 ; 6957.5,-2712.5 6957.5,-2126.5 ; 6957.5,-2126.5 6985,-2126.5 ; 6985,-2712.5 7012.5,-2712.5 ; 6985,-2712.5 6985,-2126.5 ; 6985,-2126.5 7012.5,-2126.5 ; 7012.5,-2712.5 7012.5,-2126.5 ; 7012.5,-2712.5 7040,-2712.5 ; 7012.5,-2126.5 7040,-2126.5 ; 7040,-2712.5 7147.5,-2712.5 ; 7040,-2712.5 7040,-2126.5 ; 7040,-2126.5 7147.5,-2126.5 ; 7147.5,-2712.5 7147.5,-2126.5 ; 7147.5,-2712.5 7200,-2712.5 7200,-2417.5 ; 7147.5,-2126.5 7200,-2126.5 7200,-2417.5 ; J6.3@7439,-2232.5 v1(7492.5,-2232.5) 7497.5,-2232.5 v1@7497.5,-2115 ; FLT3.6@985,-2703.5 986.5,-2705 1010,-2705 1010,-2675 v1(1010,-2612.5) 987.5,-2612.5 FLT3.1@985,-2615 ~FV25.FV@985,-2675 FLT3.6@985,-2703.5
  Top Layer w50: ~FV114.FV@3342.5,-7032.5 v1(3342.5,-6890) ; ~FV113.FV@3442.5,-7032.5 v1(3442.5,-6970) v1(3442.5,-6890) ; v1(3500,-7082.5) R126.2@3524,-7082.5 ; 3570,-7015 ~FV112.FV@3570,-6890 ; 3622.5,-6890 v1(3640,-6890) ; v1(3850,-6890) 3892.5,-6890 ; v1(3920,-6355) 4167.5,-6355 ; v1(3920,-6247.5) 4167.5,-6247.5 ; v1(3920,-6127.5) 4167.5,-6127.5 ; v1(3920,-6007.5) 4167.5,-6007.5 ; v1(3920,-5887.5) 4167.5,-5887.5 ; v1(3920,-5767.5) 4182.5,-5767.5 ; v1(4197.5,-6377.5) 4992.3,-6377.5 ; 4435,-5287.5 4980.1,-5287.5 ; ~FV104.FV@4497.4,-5707.5 4594.9,-5610 ; 4582.5,-4907.5 v1(4800,-4907.5) ; v1(4847.4,-5495) v1@4847.4,-5365 ; v1(4992.4,-6307.5) 4992.4,-6287.5 4992.4,-6267.5 ; 4995,-5555 ~FV59.FV@4995,-5287.5 ; 5493.67,-5045 5493.67,-5073.67 v1(5505,-5085) ; 5500,-4940 5500,-4952.5 5505,-4957.5 v1(5505,-4980) ; ~FV117.FV@6010,-6120 6057.5,-6167.5
  Top Layer w51: v1(3205,-7470) v1(3255,-7470) v1(3305,-7470) v1(3355,-7470) v1(3405,-7470) v1(3455,-7470) v1(3505,-7470) ; v1(3205,-7420) v1(3255,-7420) v1(3305,-7420) v1(3355,-7420) v1(3405,-7420) v1(3455,-7420) v1(3505,-7420) ; v1(3205,-7375) v1(3255,-7375) v1(3305,-7375) v1(3355,-7375) v1(3405,-7375) v1(3455,-7375) v1(3505,-7375) ; v1(3205,-7325) v1(3255,-7325) v1(3305,-7325) v1(3355,-7325) v1(3405,-7325) v1(3455,-7325) v1(3505,-7325) ; v1(3205,-7275) v1(3255,-7275) v1(3305,-7275) v1(3355,-7275) v1(3405,-7275) v1(3455,-7275) v1(3505,-7275) ; v1(3205,-5810) v1(3205,-5860) v1(3205,-5910) v1(3205,-5955) v1(3205,-6005) v1(3205,-6055) v1(3205,-6105) v1(3205,-6155) v1(3205,-6205) v1(3205,-6255) v1(3205,-6305) v1(3205,-6355) v1(3205,-6405) v1(3205,-6455) v1(3205,-6505) v1(3205,-6555) v1(3205,-6605) v1(3205,-6655) v1(3205,-6705) v1(3205,-6755) v1(3205,-6830) v1(3205,-6885) v1(3205,-6935) v1(3205,-6990) v1(3205,-7040) v1(3205,-7095) v1(3205,-7145) v1(3205,-7225) v1(3255,-7225) ; v1(3255,-5860) v1(3255,-5910) v1(3255,-5955) v1(3255,-6005) v1(3255,-6055) v1(3255,-6105) v1(3255,-6155) v1(3255,-6205) v1(3255,-6255) v1(3255,-6305) v1(3255,-6355) v1(3255,-6405) v1(3255,-6455) v1(3255,-6505) v1(3255,-6555) v1(3255,-6605) v1(3255,-6655) v1(3255,-6705) v1(3255,-6755) v1(3255,-6830) v1(3255,-6885) v1(3255,-6935) v1(3255,-6990) v1(3255,-7040) v1(3255,-7095) v1(3255,-7145) v1(3255,-7225) ; v1(3255,-5810) v1(3255,-5760) ; v1(3305,-6505) v1(3305,-6455) v1(3305,-6405) v1(3305,-6355) v1(3305,-6305) v1(3305,-6255) v1(3305,-6205) v1(3305,-6155) v1(3305,-6105) v1(3305,-6055) v1(3305,-6005) v1(3305,-5955) v1(3305,-5910) v1(3305,-5860) v1(3305,-5810) ; v1(3355,-6505) v1(3355,-6455) v1(3355,-6405) v1(3355,-6355) v1(3355,-6305) v1(3355,-6255) v1(3355,-6205) v1(3355,-6155) v1(3355,-6105) v1(3355,-6055) v1(3355,-6005) v1(3355,-5955) v1(3355,-5910) v1(3355,-5860) ; v1(3405,-7620) v1(3455,-7620) v1(3505,-7620) v1(3555,-7620) v1(3605,-7620) v1(3655,-7620) v1(3705,-7620) v1(3755,-7620) v1(3805,-7620) v1(3855,-7620) v1(3905,-7620) v1(3955,-7620) v1(4005,-7620) ; v1(3405,-7570) v1(3455,-7570) v1(3505,-7570) v1(3555,-7570) v1(3605,-7570) v1(3655,-7570) v1(3705,-7570) v1(3755,-7570) v1(3805,-7570) v1(3855,-7570) v1(3905,-7570) v1(3955,-7570) v1(4005,-7570) ; v1(3405,-7520) v1(3455,-7520) v1(3505,-7520) v1(3555,-7520) v1(3605,-7520) v1(3655,-7520) v1(3705,-7520) v1(3755,-7520) v1(3805,-7520) v1(3855,-7520) v1(3905,-7520) v1(3955,-7520) v1(4005,-7520) ; v1(3405,-6505) v1(3405,-6455) v1(3405,-6405) v1(3405,-6355) v1(3405,-6305) v1(3405,-6255) v1(3405,-6205) v1(3405,-6155) v1(3405,-6105) v1(3405,-6055) v1(3405,-6005) v1(3405,-5955) v1(3405,-5910) v1(3405,-5860) v1(3405,-5810) v1(3405,-5760) ; v1(3455,-6505) v1(3455,-6455) v1(3455,-6405) v1(3455,-6355) v1(3455,-6305) v1(3455,-6255) v1(3455,-6205) v1(3455,-6155) v1(3455,-6105) v1(3455,-6055) v1(3455,-6005) v1(3455,-5955) v1(3455,-5910) v1(3455,-5860) v1(3455,-5810) v1(3455,-5760) ; v1(3505,-7225) v1(3455,-7225) v1(3405,-7225) v1(3355,-7225) v1(3305,-7225) v1(3255,-7225) ; v1(3505,-6505) v1(3505,-6455) v1(3505,-6405) v1(3505,-6355) v1(3505,-6305) v1(3505,-6255) v1(3505,-6205) v1(3505,-6155) v1(3505,-6105) v1(3505,-6055) v1(3505,-6005) v1(3505,-5955) v1(3505,-5910) v1(3505,-5860) v1(3505,-5810) v1(3505,-5760) ; v1(3555,-6810) v1(3555,-6760) v1(3555,-6705) v1(3555,-6655) v1(3555,-6605) v1(3555,-6555) v1(3555,-6505) v1(3555,-6455) v1(3555,-6405) v1(3555,-6355) v1(3555,-6305) v1(3555,-6255) v1(3555,-6205) v1(3555,-6155) v1(3555,-6105) v1(3555,-6055) v1(3555,-6005) v1(3555,-5955) v1(3555,-5910) v1(3555,-5860) v1(3555,-5810) v1(3555,-5760) ; v1(3605,-6655) v1(3605,-6605) ; v1(3605,-6555) v1(3605,-6505) v1(3605,-6455) v1(3605,-6405) v1(3605,-6355) v1(3605,-6305) v1(3605,-6255) v1(3605,-6205) v1(3605,-6155) v1(3605,-6105) v1(3605,-6055) v1(3605,-6005) v1(3605,-5955) v1(3605,-5910) v1(3605,-5860) v1(3605,-5810) v1(3605,-5760) ; v1(3655,-6810) v1(3655,-6760) v1(3655,-6705) v1(3655,-6655) v1(3655,-6605) v1(3655,-6555) v1(3655,-6505) v1(3655,-6455) v1(3655,-6405) v1(3655,-6355) v1(3655,-6305) v1(3655,-6255) v1(3655,-6205) v1(3655,-6155) v1(3655,-6105) v1(3655,-6055) v1(3655,-6005) v1(3655,-5955) v1(3655,-5910) v1(3655,-5860) v1(3655,-5810) v1(3655,-5760) ; v1(3705,-6760) v1(3705,-6705) v1(3705,-6655) v1(3705,-6605) v1(3705,-6555) v1(3705,-6505) v1(3705,-6455) v1(3705,-6405) v1(3705,-6355) v1(3705,-6305) v1(3705,-6255) v1(3705,-6205) v1(3705,-6155) v1(3705,-6105) v1(3705,-6055) v1(3705,-6005) v1(3705,-5955) v1(3705,-5910) v1(3705,-5860) v1(3705,-5810) v1(3705,-5760) ; v1(3755,-6810) v1(3755,-6760) v1(3755,-6705) v1(3755,-6655) v1(3755,-6605) v1(3755,-6555) v1(3755,-6505) v1(3755,-6455) v1(3755,-6405) v1(3755,-6355) v1(3755,-6305) v1(3755,-6255) v1(3755,-6205) v1(3755,-6155) v1(3755,-6105) v1(3755,-6055) v1(3755,-6005) v1(3755,-5955) v1(3755,-5910) v1(3755,-5860) v1(3755,-5810) v1(3755,-5760) v1(3755,-5720) v1(3755,-5670) v1(3755,-5620) ; v1(3805,-6760) v1(3805,-6705) v1(3805,-6655) v1(3805,-6605) v1(3805,-6555) v1(3805,-6505) v1(3805,-6455) v1(3805,-6405) v1(3805,-6355) v1(3805,-6305) v1(3805,-6255) v1(3805,-6205) v1(3805,-6155) v1(3805,-6105) v1(3805,-6055) v1(3805,-6005) v1(3805,-5955) v1(3805,-5910) v1(3805,-5860) v1(3805,-5810) v1(3805,-5760) v1(3805,-5720) v1(3805,-5670) v1(3805,-5620) ; v1(3855,-6760) v1(3855,-6705) v1(3855,-6655) v1(3855,-6605) v1(3855,-6555) v1(3855,-6505) v1(3855,-6455) v1(3855,-6405) v1(3855,-6355) v1(3855,-6305) v1(3855,-6255) v1(3855,-6205) v1(3855,-6155) v1(3855,-6105) v1(3855,-6055) v1(3855,-6005) v1(3855,-5955) v1(3855,-5910) v1(3855,-5860) v1(3855,-5810) v1(3855,-5760) v1(3855,-5720) v1(3855,-5670) ; v1@3920,-6705 v1(4205,-6705) v1(4255,-6705) v1(4305,-6705) v1(4355,-6705) v1(4405,-6705) v1(4455,-6705) v1(4505,-6705) v1(4555,-6705) v1(4605,-6705) v1(4655,-6705) v1(4705,-6705) v1(4755,-6705) v1(4805,-6705) v1(4905,-6705) v1(4955,-6705) v1(5005,-6705) v1(5055,-6705) v1(5105,-6705) v1(5255,-6705) v1(5305,-6705) v1(5355,-6705) v1(5405,-6705) v1(5455,-6705) v1(5505,-6705) v1(5555,-6705) v1(5605,-6705) v1(5655,-6705) v1(5705,-6705) v1(5755,-6705) v1(5805,-6705) v1(5855,-6705) v1(5905,-6705) v1(5955,-6705) ; v1(3920,-6555) v1(4205,-6555) v1(4255,-6555) v1(4305,-6555) v1(4355,-6555) v1(4405,-6555) v1(4455,-6555) v1(4505,-6555) v1(4555,-6555) v1(4605,-6555) v1(4655,-6555) v1(4705,-6555) v1(4755,-6555) v1(4805,-6555) v1(4855,-6555) v1(4905,-6555) v1(4955,-6555) v1(5005,-6555) v1(5055,-6555) v1(5105,-6555) v1(5155,-6555) v1(5255,-6555) v1(5305,-6555) v1(5355,-6555) v1(5405,-6555) v1(5455,-6555) v1(5505,-6555) v1(5555,-6555) v1(5605,-6555) v1(5655,-6555) v1(5705,-6555) v1(5755,-6555) v1(5805,-6555) v1(5855,-6555) v1(5905,-6555) v1(5955,-6555) ; v1(4055,-7620) v1(4055,-7570) v1(4055,-7520) v1(4055,-7470) v1(4055,-7420) v1(4055,-7370) v1(4055,-7320) v1(4055,-7270) ; v1(4105,-7620) v1(4105,-7570) v1(4105,-7520) v1(4105,-7470) v1(4105,-7420) v1(4105,-7370) v1(4105,-7320) v1(4105,-7270) ; v1(4205,-6655) v1(4255,-6655) v1(4305,-6655) v1(4355,-6655) v1(4405,-6655) v1(4455,-6655) v1(4505,-6655) v1(4555,-6655) v1(4605,-6655) v1(4655,-6655) v1(4705,-6655) v1(4755,-6655) v1(4805,-6655) v1(4855,-6655) v1(4905,-6655) v1(4955,-6655) v1(5005,-6655) v1(5055,-6655) v1(5105,-6655) v1(5155,-6655) v1(5255,-6655) v1(5305,-6655) v1(5355,-6655) v1(5405,-6655) v1(5455,-6655) v1(5505,-6655) v1(5555,-6655) v1(5605,-6655) v1(5655,-6655) v1(5705,-6655) v1(5755,-6655) v1(5805,-6655) v1(5855,-6655) v1(5905,-6655) v1(5955,-6655) ; v1(4205,-6605) v1(4255,-6605) v1(4305,-6605) v1(4355,-6605) v1(4405,-6605) v1(4455,-6605) v1(4505,-6605) v1(4555,-6605) v1(4605,-6605) v1(4655,-6605) v1(4705,-6605) v1(4755,-6605) v1(4805,-6605) v1(4855,-6605) v1(4905,-6605) v1(4955,-6605) v1(5005,-6605) v1(5055,-6605) v1(5105,-6605) v1(5155,-6605) v1(5255,-6605) v1(5305,-6605) v1(5355,-6605) v1(5405,-6605) v1(5455,-6605) v1(5505,-6605) v1(5555,-6605) v1(5605,-6605) v1(5655,-6605) v1(5705,-6605) v1(5755,-6605) v1(5805,-6605) v1(5855,-6605) v1(5905,-6605) v1(5955,-6605) ; v1(5055,-6505) v1(5105,-6505) v1(5155,-6505) v1(5255,-6505) v1(5305,-6505) v1(5355,-6505) v1(5405,-6505) v1(5455,-6505) v1(5505,-6505) v1(5555,-6505) v1(5605,-6505) v1(5655,-6505) v1(5705,-6505) v1(5755,-6505) v1(5805,-6505) v1(5855,-6505) v1(5905,-6505) v1(5955,-6505) ; v1(5520,-7620) v1(5570,-7620) v1(5620,-7620) v1(5670,-7620) v1(5720,-7620) v1(5770,-7620) v1(5820,-7620) v1(5870,-7620) v1(5920,-7620) v1(5970,-7620) v1(6020,-7620) v1(6070,-7620) v1(6120,-7620) ; v1(5520,-7570) v1(5570,-7570) v1(5620,-7570) v1(5670,-7570) v1(5720,-7570) v1(5770,-7570) v1(5820,-7570) v1(5870,-7570) v1(5920,-7570) v1(5970,-7570) v1(6020,-7570) v1(6070,-7570) v1(6120,-7570) ; v1(5570,-7520) v1(5620,-7520) v1(5670,-7520) v1(5720,-7520) v1(5770,-7520) v1(5820,-7520) v1(5870,-7520) v1(5920,-7520) v1(5970,-7520) v1(6020,-7520) v1(6070,-7520) v1(6120,-7520) ; v1(6020,-7470) v1(6020,-7420) v1(6020,-7370) v1(6020,-7320) v1(6020,-7270) v1(6020,-7220) v1(6020,-7170) v1(6020,-7120) ; v1(6070,-7320) v1(6070,-7270) ; v1(6120,-7470) v1(6120,-7420) v1(6120,-7370) v1(6120,-7320) v1(6120,-7270) v1(6120,-7220) v1(6120,-7170) v1(6120,-7120) ; v1(6170,-7470) v1(6170,-7420) v1(6170,-7370) v1(6170,-7320) v1(6170,-7270) v1(6170,-7220) v1(6170,-7170) v1(6170,-7120) ; v1(6220,-7470) v1(6220,-7420) v1(6220,-7370) v1(6220,-7320) v1(6220,-7270) v1(6220,-7220) v1(6220,-7170) v1(6220,-7120) ; v1(6270,-7470) v1(6270,-7420) ; v1@6317.99,-7470 v1(6317.99,-7465.81) v1(6317.99,-7415.81) v1(6317.99,-7365.81) v1(6317.99,-7320.81) v1(6317.99,-7270.81) v1(6317.99,-7220.81) v1(6317.99,-7170.81) v1(6317.99,-7120.81)
  Top Layer w55: v1(4205,-6505) v1(4255,-6505) v1(4305,-6505) v1(4355,-6505) v1(4405,-6505) v1(4455,-6505) v1(4505,-6505) v1(4555,-6505) v1(4605,-6505) v1(4655,-6505) v1(4705,-6505) v1(4755,-6505) v1(4805,-6505) v1(4855,-6505) v1(4905,-6505) v1(4955,-6505) v1(5005,-6505) v1(5055,-6505) ; v1(6070,-7470) v1(6070,-7420) v1(6070,-7370) v1(6070,-7320) ; v1(6070,-7270) v1(6070,-7220) v1(6070,-7170) v1(6070,-7120) ; v1(6270,-7420) v1(6270,-7370) v1(6270,-7320) v1(6270,-7270) v1(6270,-7220) v1(6270,-7170) v1(6270,-7120)
  Top Layer w60: v1(3205,-5810) v1(3205,-5760) ; v1(3255,-5860) v1(3255,-5810) ; v1(3305,-5810) v1(3305,-5760) ; v1(3355,-5860) v1(3355,-5810) v1(3355,-5760) ; v1(3605,-6810) v1(3605,-6760) v1(3605,-6705) v1(3605,-6655) ; v1(3605,-6605) v1(3605,-6555) ; v1(3705,-6810) v1(3705,-6760) ; v1(3805,-6810) v1(3805,-6760) ; v1(3855,-6810) v1(3855,-6760) ; v1(3920,-6655) v1(4205,-6655) ; v1(3920,-6605) v1(4205,-6605) ; v1(3920,-6505) v1(4205,-6505) ; v1(5740,-6420) 5740,-6050 ; v1(5810,-6420) 5810,-6120 ; v1(5880,-6420) ~FV119.FV@5880,-6120 ; v1(5940,-6420) ~FV118.FV@5940,-6120
  Top Layer w75: 690,-3760 TestPoint9.TestPoint9@690,-3385 TestPoint10.TestPoint10@690,-2885 TestPoint11.TestPoint11@690,-2385 690,-2010 TestPoint12.TestPoint12@815,-2010 TestPoint1.TestPoint1@1315,-2010 TestPoint2.TestPoint2@1815,-2010 1940,-2010 TestPoint3.TestPoint3@1940,-2385 TestPoint4.TestPoint4@1940,-2885 TestPoint5.TestPoint5@1940,-3385 1940,-3760 TestPoint6.TestPoint6@1815,-3760 TestPoint7.TestPoint7@1315,-3760 TestPoint8.TestPoint8@815,-3760 690,-3760
  Mid-Layer 1 w12: 3357.5,-3185 3357.5,-3227.5 3380,-3205 3380,-2737.5 3362.5,-2720 ; 3357.5,-2520 3357.5,-2637.5 3380.5,-2614.5 3380.5,-2582.5 ; v1(3377.5,-5080) v1(3377.5,-5107.5) 3377.5,-5150 3397.5,-5170 3405,-5162.5 v1(3405,-5107.5) v1(3405,-5080) 3380,-5080 v1@3377.5,-5077.5 ; 3427.5,-2558.5 3409.5,-2558.5 3405,-2558.5 3380.5,-2534 3380.5,-2582.5 ; 3440.5,-2558.5 3450.5,-2558.5 3426.5,-2582.5 3380.5,-2582.5 ; 3555,-2367.5 3557.5,-2365 3557.5,-2222.5 ; 3650,-2500 3723,-2500 3776.5,-2553.5 ; v1@3765,-5277.5 3765,-5282.5 v1(3767.5,-5280) ; 3775,-3715 3797.5,-3715 3797.5,-3742.5 ; 3775.8,-2554.2 3776.5,-2553.5 ; 3895,-3745 3895,-3715 ; 3982.5,-3285 4005,-3285 4082.5,-3285 4092.5,-3295 4092.5,-3587.5 ; 4092.5,-3625 4092.5,-3682.5 4125,-3715 ; 4092.5,-2727.5 4085,-2720 3932.5,-2720 3932.5,-2697.5 3852.5,-2617.5 3782.5,-2617.5 3782.5,-2559.5 3776.5,-2553.5 ; 4292.5,-3420 4292.5,-3727.5 4315,-3705 4315,-3220 4307.5,-3212.5 4292.5,-3227.5 4292.5,-3365 ; v1(4425,-7297.5) 4492.5,-7230 4727.5,-7230 4717.5,-7220 4477.5,-7220 4467.5,-7210 4480,-7197.5 4557.5,-7197.5 4617.5,-7197.5 4677.5,-7197.5 4722.5,-7197.5 4735,-7210 v1@4707.6,-7210 ; v1(4497.5,-7210) v1(4527.5,-7210) v1(4557.5,-7210) ~FV88.FV@4587.5,-7210 ~FV89.FV@4617.5,-7210 v1(4647.5,-7210) v1(4677.5,-7210) v1@4707.6,-7210 ; v1(4665,-3407.5) 4772.5,-3407.5 v1(4860,-3495) ; v1(4707.6,-7210.1) v1@4707.6,-7210 ; v1(4847.4,-5495) v1(4847.4,-5360) ; 4900,-5785 4902.4,-5787.4 4902.4,-5907.5 v1(4937.4,-5907.5) v1(4972.4,-5907.5) ; v1(5235,-7205.2) ~FV53.FV@5300,-7205.2 v1(5350,-7205.2) ; v1(5300,-7147.7) 5327.5,-7175.2 5350,-7175.2 ; v1(5400,-7330.2) v1(5400,-7205.2) ; 6342.5,-2307.5 6342.5,-2190 ; v1(5350,-7205.2) 5350,-7175.2 ; v1(5350,-7205.2) v1(5400,-7205.2) ; 5350,-7175.2 5400,-7175.2 v1(5400,-7205.2) ; 3585,-2682.5 3632.5,-2682.5 3637.5,-2682.5 3637.5,-2720 3630,-2727.5 3585,-2682.5 ; 3722.5,-2340 3722.5,-2242.5 3742.5,-2222.5 3742.5,-2340 3737.5,-2340 3722.5,-2340
  Mid-Layer 1 w20: 3762.5,-2825 3782.5,-2825 3787.5,-2825 ; 4170,-3422.5 4170,-3472.5 4142.5,-3460 4142.5,-3435 4165.1,-3422.68 4170,-3420 4202.83,-3428.76 4207.5,-3430 4242.5,-3430 4247.5,-3430 4247.5,-3455 4242.5,-3455 4207.5,-3455 ; v1(4255,-7497.5) v1(4475,-7497.5) ; v1(4315,-7462.5) 4370,-7462.5 v1(4375,-7457.5) ; v1(6272.5,-3252.5) 6340,-3320 v1(6340,-3585)
  Mid-Layer 1 w50: U23.S1@4594.9,-7578.2 4580.7,-7592.4 U23.S4@4580.7,-7812.5 U23.S3@4934.3,-7812.5 4934.3,-7592.4 U23.S2@4920.1,-7578.2
  Bottom Layer w12: 3357.5,-2520 3357.5,-2640 3380.5,-2617 3380.5,-2534 3405,-2558.5 ; 3462.5,-2367.5 3550,-2367.5 3555,-2367.5 ; 3474.5,-2582.5 3456.25,-2564.25 3450.5,-2558.5 3474.5,-2534.5 ; 3570,-2492.5 3577.5,-2500 3645,-2500 3650,-2500 ; 3645,-3700 3645,-3617.5 ; 3775,-3715 3776.25,-3716.25 ; 3797.5,-3715 3797.5,-3695 ; 3797.5,-3645 3797.5,-3695 ; 3800,-3567.5 3820,-3567.5 3860,-3567.5 3885,-3567.5 3955,-3567.5 3990,-3532.5 ; 3927.5,-3715 3922.5,-3720 ; v1(4861,-7595.5) 4902.8,-7595.5 U23.S2@4920.1,-7578.2 ; v1(5515,-4290) 5550,-4290 v1(5560,-4280) 5560,-4196.5 5550,-4186.5 5550,-4112.5 5545,-4107.5 5545,-4053.5 5550,-4048.5 5601,-4048.5 5630,-4077.5 v1(5630,-4230) ; 6227.5,-2190 6342.5,-2190 6342.5,-2307.5 ; 3776.25,-3716.25 3772.5,-3720 3780,-3720 ; 3776.25,-3716.25 3776.3,-3716.2 ; 3776.25,-3716.25 3776.3,-3716.3 ; 3776.3,-3716.3 3776.3,-3716.2 ; 3776.3,-3716.3 3780,-3720 ; 3776.3,-3716.2 3797.5,-3695 ; 3780,-3720 3922.5,-3720 ; 3780,-3720 3797.5,-3737.5 3797.5,-3742.5 3892.5,-3742.5 3895,-3745 3897.5,-3745 3922.5,-3720
  Bottom Layer w20: 3357.5,-3185 3380,-3162.5 3380,-2862.5 ; 3357.5,-3107.5 3357.5,-3050 ; 3357.5,-2725 3380,-2747.5 3380,-2787.5 ; 3388,-2558.5 3405,-2558.5 3409.5,-2558.5 3435.5,-2558.5 3450.5,-2558.5 3462,-2558.5 3467,-2558.5 ; 3557.5,-2280 3557.5,-2222.5 ; v1(3637.5,-5317.5) 3730,-5317.5 v1(3767.5,-5280) 3852.5,-5280 v1(3855,-5282.5) ; 3637.5,-2707.5 3637.5,-2682.5 ; 3665,-3037.5 3654,-3037.5 3642.5,-3037.5 3737.5,-3132.5 3767.5,-3132.5 3772.5,-3132.5 3772.5,-3157.5 ; 3685,-2635 3685,-2607.5 3702.5,-2590 ; 3742.5,-2340 3742.5,-2252.5 ; 3762.5,-2825 3782.5,-2825 3880,-2825 3905,-2850 ; J1.22@3906.1,-4767 v1@3906.1,-4633.6 ; 3932.5,-2720 4085,-2720 4092.5,-2727.5 ; 3982.5,-3285 4005,-3285 4010,-3285 4010,-3227.5 ; 4092.5,-3330 4092.5,-3440 ; 4130,-7497.5 v1(4255,-7497.5) 4315,-7497.5 ; v1(4162.5,-5347.5) v1(4162.5,-5317.5) v1(4162.5,-5267.5) v1(4162.5,-5192.5) v1(4162.5,-5117.5) v1(4162.5,-5047.5) ; 4292.5,-3585 4292.5,-3420 ; 4292.5,-3255 4292.5,-3227.5 ; v1(4315,-7572.5) 4315,-7497.5 ; v1(4375,-7457.5) 4370,-7462.5 v1(4315,-7462.5) 4315,-7497.5 ; C7.2@4750,-3185 4770,-3185 v1(4782.5,-3197.5) ; v1(4830,-7012.5) 4904.8,-6937.7 v1(4920,-6937.7) ; v1(5000,-7177.7) 5110,-7067.7 5110,-7030 5160,-6980 5160.2,-6980.2 v1(5240,-6980.2) ; U34.10@5060,-4312.5 v1(5130,-4312.5) ; 4092.5,-3440 4137.5,-3440 4155,-3422.5 4165,-3422.5 4200,-3422.5 4207.5,-3430 4242.5,-3430 4247.5,-3430 4247.5,-3455 4242.5,-3455 4202.5,-3455 4177.5,-3455 4170,-3447.5 4157.5,-3460 4137.5,-3460 4107.5,-3460 4092.5,-3475 4092.5,-3440 ; 3377.5,-5140 v1(3377.5,-5107.5) v1(3377.5,-5080) v1(3405,-5080) v1(3405,-5107.5) 3405,-5137.5 3402.5,-5140 3377.5,-5140
  Bottom Layer w25: v1(4425,-7297.5) 4492.6,-7229.9 4557.5,-7229.9 4617.5,-7229.9 4707.6,-7229.9 v1(4707.6,-7210.1) ; v1(4707.6,-7210.1) C75.2@4707.6,-7186.1 4707.6,-7180.1 4697.7,-7190 4647.5,-7190 4517.5,-7190 v1(4497.5,-7210) v1(4527.5,-7210) v1(4557.5,-7210) ~FV88.FV@4587.5,-7210 ~FV89.FV@4617.5,-7210 v1(4647.5,-7210) v1(4677.5,-7210) 4707.5,-7210 v1(4707.6,-7210.1)